# Altium PCB PCB1.PcbDoc (part 2 of 3)
Units mm, origin at the board's own origin, x right, y up, seen from the top; angles counter-clockwise.
Board outline 115 x 52 mm, 2 copper layers (Top Layer, Bottom Layer); 184 components, 116 nets, 555 pads, 115 vias.
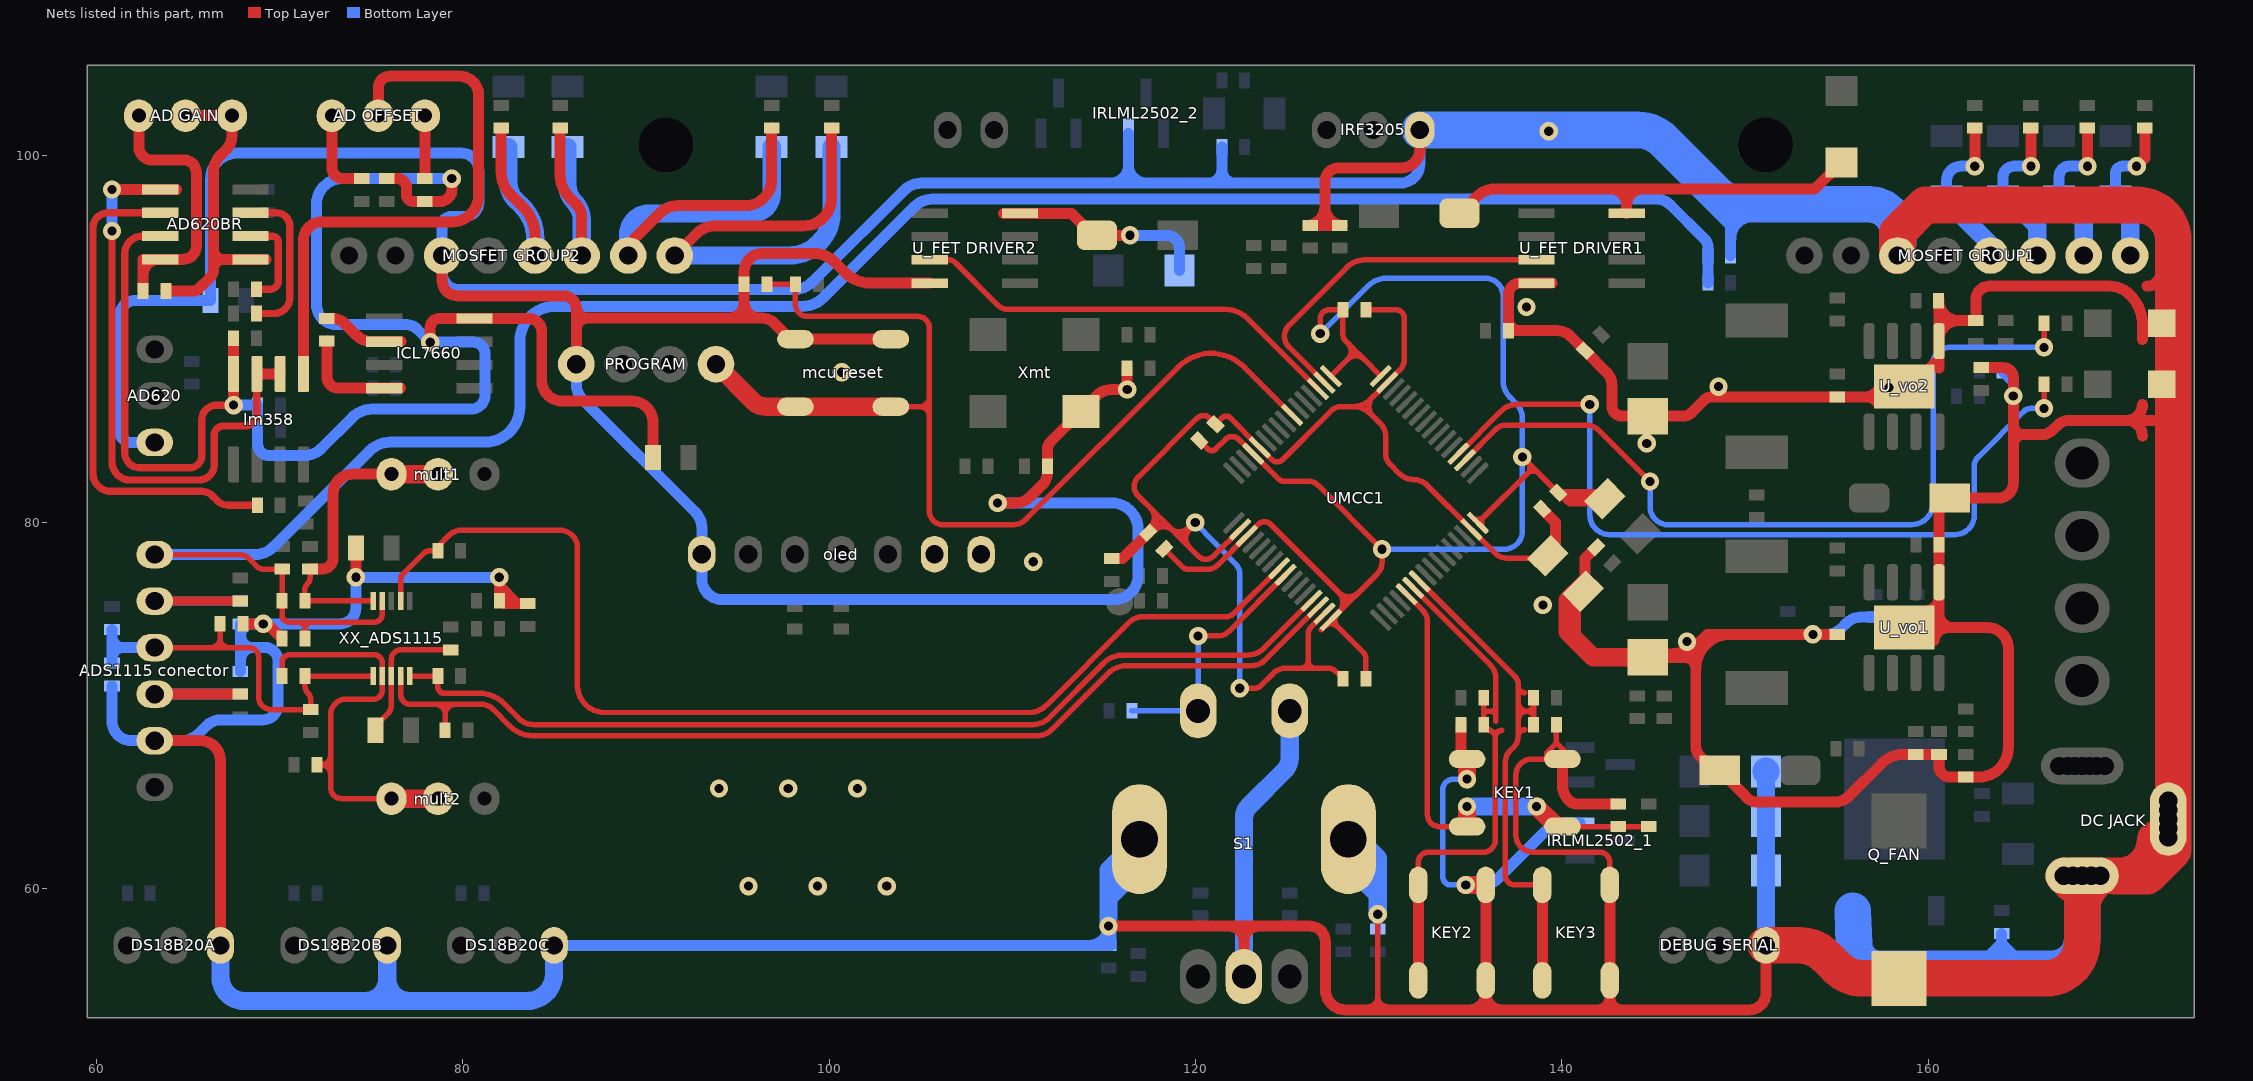
[diagram p2: the nets of this part, all layers, seen from the top]

## Via types
v1: diameter 1, hole 0.5, Top Layer to Bottom Layer, 115 vias

## Nets (pads, with @x,y where several pads share a name; then routed paths per layer and width w, separated by ;. In a path a pad name is that pad's centre, name@x,y a point inside that pad or via, vN(x,y) a via of type N, cw(c..) or ccw(c..) an arc to the next point about the centre after c; other vN are vias at no path point) (continued)
ADIN0: "ADS1115 conector.6" C_Lp1.1 C_LpM1.2 RTW1.2 VOLTAGE_DEVIDE1.2 VOLTAGE_DEVIDE2.2 XX_ADS1115.4 | length 116.4
  Top Layer w0.3: 63.179,78.244 67.766,78.244 cw(c67.766,77.423) 68.346,78.004 68.737,77.613 ccw(c69.153,78.029) 69.153,77.441 RTW1.2@70.136,77.441 C_Lp1.1@70.136,75.711 70.136,74.944 ccw(c70.53,74.944) 70.53,74.55 71.03,74.55 ; C_LpM1.2@71.38,73.66 71.38,74.2 ; XX_ADS1115.4@75.604,75.711 75.604,74.984 cw(c75.17,74.984) 75.17,74.55 71.73,74.55 ; 71.03,74.55 cw(c71.03,74.2) 71.38,74.2 ; 71.03,74.55 71.73,74.55 ; 71.38,74.2 cw(c71.73,74.2) 71.73,74.55
  Bottom Layer w0.6: 63.179,78.244 68.656,78.244 ccw(c68.656,79.664) 69.659,78.659 74.875,83.875 cw(c76.094,82.656) 76.094,84.38 81.205,84.38 ccw(c81.205,86.285) 83.11,86.285 83.11,89.868 cw(c85.032,89.868) 85.032,91.79 98.517,91.79 ccw(c98.517,93.462) 99.7,92.28 104.658,97.238 cw(c105.63,96.264) 105.63,97.64 145.18,97.64 cw(c145.18,96.602) 145.914,97.336 147.79,95.46 cw(c147.354,95.025) 147.97,95.025 VOLTAGE_DEVIDE2.2@147.97,94.564 VOLTAGE_DEVIDE1.2@147.97,93.07
ADIN1: C_Lp1.2 mult1.2 mult1.3 RTW2.1 XX_ADS1115.5 | length 17
  Top Layer w0.3: RTW2.1@71.66,77.441 71.66,76.978 cw(c71.182,76.978) 71.52,76.64 ccw(c71.859,76.302) 71.38,76.302 C_Lp1.2@71.38,75.711 XX_ADS1115.5@75.104,75.711
  Top Layer w0.6: RTW2.1@71.66,77.441 72.29,77.441 ccw(c72.29,78.071) 72.92,78.071 72.92,81.567 cw(c73.983,81.567) 73.983,82.63 mult1.3@76.104,82.63
  Top Layer w1: mult1.3@76.104,82.63 mult1.2@78.644,82.63
ADIN2: "ADS1115 conector.4" C_Lp2.1 C_LpM2.2 RTW4.2 VOLTAGE_DEVIDE3.2 VOLTAGE_DEVIDE4.2 XX_ADS1115.6 | length 24.8
  Top Layer w0.3: 63.179,73.164 66.27,73.164 ; C_LpM2.2@66.748,74.46 66.748,73.642 ; 71.545,70.685 cw(c71.943,71.083) 71.38,71.083 C_Lp2.1@71.38,71.611 XX_ADS1115.6@75.104,71.611 ; 71.545,70.685 cw(c71.147,70.287) 71.71,70.287 RTW4.2@71.71,69.781 69.549,69.781 cw(c69.549,70.48) 68.85,70.48 68.85,72.67 ccw(c68.356,72.67) 68.356,73.164 67.226,73.164 ; 66.27,73.164 ccw(c66.27,73.642) 66.748,73.642 ; 66.27,73.164 67.226,73.164 ; 66.748,73.642 ccw(c67.226,73.642) 67.226,73.164
  Bottom Layer w0.6: VOLTAGE_DEVIDE4.2@60.85,72.31 VOLTAGE_DEVIDE4.2@60.85,72.569 ; VOLTAGE_DEVIDE3.2@60.85,74.156 60.85,73.76 ; 63.179,73.164 61.446,73.164 ; VOLTAGE_DEVIDE4.2@60.85,72.569 cw(c61.446,72.569) 61.446,73.164 ; VOLTAGE_DEVIDE4.2@60.85,72.569 60.85,73.76 ; 60.85,73.76 ccw(c61.446,73.76) 61.446,73.164
ADIN3: C_Lp2.2 mult2.2 mult2.3 RTW5.1 XX_ADS1115.7 | length 23.6
  Top Layer w0.3: C_Lp2.2@70.136,71.611 70.136,72.377 cw(c70.53,72.377) 70.53,72.772 75.17,72.772 cw(c75.17,72.337) 75.604,72.337 XX_ADS1115.7@75.604,71.611 75.604,70.834 cw(c75.12,70.834) 75.12,70.35 73.637,70.35 ccw(c73.637,69.493) 72.78,69.493 72.78,67.27 ; mult2.3@76.104,64.92 73.38,64.92 cw(c73.38,65.52) 72.78,65.52 72.78,66.25 ; 72.78,66.25 ccw(c72.27,66.25) 72.27,66.76 ccw(c72.27,67.27) 72.78,67.27 ; 72.78,66.25 72.78,67.27
  Top Layer w1: mult2.3@76.104,64.92 mult2.2@78.644,64.92
ADS_1115_SCK: R_SCL.2 UMCC1.29 XX_ADS1115.10 | length 53.2
  Top Layer w0.3: XX_ADS1115.10@77.104,71.611 R_SCL.2@78.639,71.611 78.639,71.001 ccw(c78.97,71.001) 78.97,70.67 80.904,70.67 cw(c80.904,68.772) 82.246,70.114 83.074,69.286 ccw(c83.86,70.072) 83.86,68.96 111.123,68.96 ccw(c111.123,70.185) 111.989,69.319 115.017,72.347 cw(c115.99,71.373) 115.99,72.75 122.816,72.75 ccw(c122.816,74.053) 123.737,73.132 UMCC1.29@126.331,75.725
ADS_1115_SDA: R_SDA.2 UMCC1.30 XX_ADS1115.9 | length 57.4
  Top Layer w0.3: XX_ADS1115.9@76.604,71.611 76.604,70.604 ccw(c77.139,70.604) 77.139,70.07 78.48,70.07 ; R_SDA.2@79.039,68.65 79.039,69.511 ; UMCC1.30@126.684,75.371 123.802,72.489 cw(c123.056,73.234) 123.056,72.18 116.259,72.18 ccw(c116.259,70.703) 115.213,71.746 114.019,70.551 112.136,68.669 cw(c111.39,69.415) 111.39,68.36 83.798,68.36 cw(c83.798,70.069) 82.589,68.861 81.64,69.81 ccw(c81.012,69.182) 81.012,70.07 79.597,70.07 ; 78.48,70.07 cw(c78.48,69.511) 79.039,69.511 ; 78.48,70.07 79.597,70.07 ; 79.039,69.511 cw(c79.597,69.511) 79.597,70.07
alert: R_Alert.1 UMCC1.24 XX_ADS1115.2 | length 62.4
  Top Layer w0.3: XX_ADS1115.2@76.604,75.711 76.604,76.884 cw(c76.992,76.884) 76.718,77.158 77.862,78.302 cw(c78.204,77.961) 78.204,78.444 R_Alert.1@78.639,78.444 78.639,78.679 79.261,79.301 ; 79.262,79.302 cw(c79.91,78.653) 79.91,79.57 85.307,79.57 cw(c85.307,78.617) 86.26,78.617 86.26,71.108 ccw(c87.748,71.108) 87.748,69.62 110.905,69.62 ccw(c110.905,70.96) 111.852,70.012 116.38,74.54 cw(c117.129,73.79) 117.129,74.85 121.649,74.85 ccw(c121.649,75.506) 122.112,75.042 UMCC1.24@124.563,77.493
AVCC_ANALOG: AD620BR.7 C_ICL4.1 C_LO1.1 C_LO2.1 C_LO3.1 CLOP1.1 ICL7660.8 lm358.8 RP1.2 | length 94.9
  Top Layer w0.4: AD620BR.7@63.19,95.625 62.495,95.625 ccw(c62.495,94.68) 61.55,94.68 61.55,83.79 ccw(c62.36,83.79) 62.36,82.98 65.09,82.98 ccw(c65.09,83.64) 65.75,83.64 65.75,85.58 cw(c66.569,85.58) 66.569,86.399 v1(67.49,86.399)
  Top Layer w0.6: v1(67.49,86.399) lm358.8@67.49,88.1 C_LO3.1@67.49,90.04 ; C_ICL4.1@75.86,98.763 76.427,98.763 cw(c76.427,98.27) 76.92,98.27 76.92,97.895 ccw(c77.296,97.895) 77.296,97.519 RP1.2@77.93,97.519 78.759,97.519 ccw(c78.759,98.162) 79.402,98.162 79.402,98.763 v1(79.4,98.763) ; v1(78.22,89.835) 78.22,90.61 cw(c78.745,90.61) 78.745,91.135 ICL7660.8@80.644,91.135 83.575,91.135 cw(c83.575,90.4) 84.31,90.4 84.31,87.74 ccw(c85.43,87.74) 85.43,86.62 89.21,86.62 cw(c89.21,85.44) 90.39,85.44 CLOP1.1@90.39,83.54
  Bottom Layer w0.6: v1(67.49,86.399) C_LO2.1@68.806,86.399 C_LO1.1@68.806,85.039 68.806,84.274 ccw(c69.43,84.274) 69.43,83.65 71.371,83.65 ccw(c71.371,84.902) 72.257,84.017 73.975,85.735 cw(c75.05,84.659) 75.05,86.18 80.45,86.18 ccw(c80.45,86.94) 81.21,86.94 81.21,89.21 ccw(c80.585,89.21) 80.585,89.835 v1(78.22,89.835) 77.488,90.567 ; 77.487,90.568 ccw(c76.95,90.03) 76.95,90.79 73.117,90.79 cw(c73.117,91.897) 72.01,91.897 72.01,97.358 cw(c73.415,97.358) 73.415,98.763 v1(79.4,98.763)
CS: oled.7
DS: oled.6
GATE1: "MOSFET GROUP1.1" D_GATE1.1 R_gate1.1 | length 8.5
  Top Layer w0.6: v1(171.37,99.44) 171.819,99.889 R_gate1.1@171.819,101.518
  Bottom Layer w0.6: D_GATE1.1@170.219,97.79 170.219,99.049 cw(c170.61,99.049) 170.61,99.44 v1(171.37,99.44)
  Bottom Layer w1: D_GATE1.1@170.219,97.79 171.019,96.99 171.019,95.871 171.019,94.564
GATE2: "MOSFET GROUP1.2" D_GATE2.1 R_gate2.1 | length 8.8
  Top Layer w0.6: v1(168.685,99.44) R_gate2.1@168.685,101.518
  Bottom Layer w0.6: D_GATE2.1@167.145,97.79 167.145,98.895 cw(c167.69,98.895) 167.69,99.44 v1(168.685,99.44)
  Bottom Layer w1: D_GATE2.1@167.145,97.79 168.479,96.457 168.479,94.564
GATE3: "MOSFET GROUP1.3" D_GATE3.1 R_gate3.1 | length 9.2
  Top Layer w0.6: v1(165.602,99.44) R_gate3.1@165.602,101.518
  Bottom Layer w0.6: D_GATE3.1@164.072,97.79 164.072,98.842 cw(c164.67,98.842) 164.67,99.44 v1(165.602,99.44)
  Bottom Layer w1: D_GATE3.1@164.072,97.79 164.34,97.79 165.939,96.191 165.939,94.564
GATE4: "MOSFET GROUP1.4" D_GATE4.1 R_gate4.1 | length 8.9
  Top Layer w0.6: v1(162.539,99.44) R_gate4.1@162.539,101.518
  Bottom Layer w0.6: D_GATE4.1@160.999,97.79 160.999,98.658 cw(c161.781,98.658) 161.781,99.44 v1(162.539,99.44)
  Bottom Layer w1: D_GATE4.1@160.999,97.571 163.399,95.171 163.399,94.564
GATE5: "MOSFET GROUP2.1" D_GATE5.1 R_gate5.1 | length 27.3
  Top Layer w0.6: 91.569,94.564 92.786,95.781 cw(c93.75,94.817) 93.75,96.18 98.602,96.18 ccw(c98.602,97.708) 100.13,97.708 R_gate5.1@100.13,101.518
  Bottom Layer w1: 91.569,94.564 97.774,94.564 ccw(c97.774,96.92) 100.13,96.92 D_GATE5.1@100.13,100.49
GATE6: "MOSFET GROUP2.2" D_GATE6.1 R_gate6.1 | length 25.5
  Top Layer w0.6: 88.75,94.87 90.774,96.894 cw(c91.73,95.938) 91.73,97.29 95.43,97.29 ccw(c95.43,98.72) 96.86,98.72 R_gate6.1@96.86,101.518
  Bottom Layer w1: 89.029,94.564 89.021,95.668 cw(c90.196,95.685) 90.196,96.86 95.79,96.86 ccw(c95.79,97.93) 96.86,97.93 D_GATE6.1@96.86,100.49
GATE7: "MOSFET GROUP2.3" D_GATE7.1 R_gate7.1 | length 13.5
  Top Layer w0.6: R_gate7.1@85.31,101.518 85.31,98.99 ccw(c87.072,98.99) 85.826,97.744 ; 85.826,97.744 86.158,97.412 ; 86.158,97.412 cw(c85.357,96.612) 86.489,96.612 86.489,94.564
  Bottom Layer w1: D_GATE7.1@85.71,100.49 85.71,98.421 ccw(c87.04,98.421) 86.099,97.481 ; 86.1,97.48 cw(c85.159,96.54) 86.489,96.54 86.489,94.564
GATE8: "MOSFET GROUP2.4" D_GATE8.1 R_gate8.1 | length 13.9
  Top Layer w0.6: R_gate8.1@82.09,101.518 82.09,99.16 ccw(c83.901,99.16) 82.62,97.88 83.285,97.215 cw(c81.681,95.611) 83.949,95.611 83.949,94.564
  Bottom Layer w1: D_GATE8.1@82.49,100.49 82.49,98.523 ccw(c83.752,98.523) 82.86,97.63 83.229,97.261 cw(c81.492,95.523) 83.949,95.523 83.949,94.564
GATE_CH1_EN: "U_FET DRIVER1.3" UMCC1.2 | length 19
  Top Layer w0.3: UMCC1.2@127.038,87.633 125.102,89.568 cw(c125.687,90.16) 125.098,90.748 128.292,93.942 cw(c129.229,93.005) 129.229,94.33 137.392,94.33 138.606,94.33
GATE_CH2_EN: "U_FET DRIVER2.3" UMCC1.3 | length 24
  Top Layer w0.3: 105.486,94.33 106.505,94.33 cw(c106.505,93.786) 106.889,94.171 109.189,91.871 ccw(c109.774,92.459) 109.774,91.63 121.607,91.63 cw(c121.607,89.875) 122.847,91.116 UMCC1.3@126.684,87.279
GND: "ADS1115 conector.2" "DC JACK.2" "DC JACK.3" "DEBUG SERIAL.1" "Elko E_1.1" "Ferrit  2.2" "mcu reset.2" "mcu reset.4" "MOSFET GROUP1.6" "MOSFET GROUP2.6" "tantal classB1.1" "tantal classB9.1" "U_FET DRIVER1.4" "U_FET DRIVER2.4" AD620.1 C_KEY1.2 C_KEY2.2 C_KEY3.2 C_LK2.1 C_LL1.2 C_LL2.2 C_LpM1.1 C_LpM2.1 C_PREG2.1 C_PREG3.1 C_PREG4.1 C_reg2.2 C_regl.2 C_reh1.2 C_rehc.2 CIP1.2 CIP2.2 CLM1.2 CLOP2.2 CLxt.2 CT1.2 CT2.1 CXT.2 CXT_Reset1.2 DPND1.1 DPNDd.1 DS18B20A.1 DS18B20B.1 DS18B20C.1 IRF3205.3 IRLML2502_1.2 IRLML2502_2.2 JUMPER1.1 JUMPER2.1 KEY1.2 KEY1.4 KEY2.2 KEY2.4 KEY3.2 KEY3.4 LED_1P.2 LED_2P.2 oled.1 PROGRAM.4 Q_FAN.3 R_ADDR1.1 R_BOOT.2 R_feedaback2.2 R_feedabacko.2 R_gateF.2 R_gateHP.2 Rreg1.2 Rregp5.2 Rrer1.2 Rrer7.2 Rrerp2.1 Rrerp6.1 S1.2 S1.C S1.SH1 S1.SH2 U_vo1.5 U_vo1.9 U_vo2.5 U_vo2.9 VOLTAGE_DEVIDE2.1 VOLTAGE_DEVIDE4.1 Xmt.2 | length 831.8
  Top Layer w0.254: R_ADDR1.1@81.994,75.711 ccw(c82.113,75.711) R_ADDR1.1@82.113,75.592
  Top Layer w0.3: 129.378,53.538 ccw(c129.378,54.11) 129.95,54.11 ; v1(129.95,58.611) 129.95,54.11 ; 130.522,53.538 cw(c130.522,54.11) 129.95,54.11 ; KEY1.2@139.18,67.14 139.18,67.43 139.7,67.95 ; C_KEY3.2@139.7,68.96 139.7,67.95 ; KEY1.2@140.029,67.077 138.357,67.077 ccw(c138.357,66.21) 137.49,66.21 137.49,62.92 ccw(c138.41,62.92) 138.41,62 142.049,62 cw(c142.049,61.436) 142.612,61.436 KEY3.4@142.612,60.207 ; KEY1.2@140.573,67.077 139.7,67.95
  Top Layer w0.6: 63.179,68.084 65.686,68.084 cw(c65.686,66.999) 66.771,66.999 DS18B20A.1@66.771,56.906 ; C_LpM2.1@67.992,74.46 v1(69.11,74.46) 69.336,74.46 C_LpM1.1@70.136,73.66 ; v1(74.164,77) CLM1.2@74.164,78.59 ; 78.869,94.564 78.869,93.221 ccw(c79.73,93.221) 79.73,92.36 85.5,92.36 cw(c85.5,91.66) 86.2,91.66 86.2,90.552 ; R_ADDR1.1@81.99,75.711 v1(81.99,77) ; R_ADDR1.1@81.994,75.711 ccw(c82.334,76.051) 82.334,75.57 C_LK2.1@83.55,75.57 ; 82.083,76.44 82.942,75.58 ; PROGRAM.4@86.2,88.635 86.2,90.552 ; 86.2,91.748 ccw(c86.8,91.75) 86.799,91.15 ; 103.367,90 98.16,90 98.118,90 cw(c98.118,90.6) 97.694,90.176 96.98,90.89 ccw(c96.352,90.262) 96.352,91.15 96.2,91.15 ; 105.486,93.06 102.26,93.06 cw(c102.26,95.015) 100.877,93.633 100.305,94.205 ccw(c99.158,93.058) 99.158,94.68 96.36,94.68 ccw(c96.36,93.682) 95.362,93.682 CXT_Reset1.2@95.362,93 95.362,91.992 ; v1(109.194,81.06) 110.171,81.06 ccw(c110.171,82.192) 110.971,81.391 111.652,82.072 ccw(c111.029,82.695) 111.91,82.695 CXT.2@111.91,83.06 111.91,83.964 cw(c112.525,83.964) 112.09,84.399 Xmt.2@113.75,86.059 ; Xmt.2@113.949,86.258 114.619,86.928 cw(c115.396,86.151) 115.396,87.25 v1(116.27,87.25) CLxt.2@116.27,88.414 ; v1(115.25,57.96) 121.83,57.96 ; S1.C@122.64,55.21 122.64,57.15 ; CIP1.2@126.125,96.214 ccw(c126.03,97.24) 127.06,97.24 ; CIP1.2@126.25,96.214 126.925,96.214 ; 126.83,96.21 ccw(c126.83,97.24) 126.925,96.214 ; CIP2.2@127.86,96.214 127.06,96.214 ; CIP2.2@127.995,96.214 cw(c128.09,97.24) 127.06,97.24 ; IRF3205.3@132.24,101.418 132.24,100.34 cw(c131.25,100.34) 131.25,99.35 127.82,99.35 ccw(c127.82,98.59) 127.06,98.59 127.06,97.24 ; C_KEY2.2@134.488,68.96 134.488,67.412 ccw(c134.822,67.412) KEY1.4@134.822,67.077 ; KEY2.4@135.844,60.207 KEY2.2@135.844,55 KEY2.2@135.844,54.274 ; 137.074,91.106 ccw(c137.72,91.106) 137.074,91.104 ; 137.72,90.46 cw(c137.72,91.106) 137.718,90.46 ; 139.47,93.06 138.606,93.06 137.72,93.06 ccw(c137.72,92.414) 137.074,92.414 137.074,91.104 ; KEY1.2@140.029,67.077 140.029,65.645 ccw(c141.169,65.645) 140.49,64.73 ccw(c140.767,65.104) 140.767,64.638 C_KEY1.2@143.08,64.638 ; 141.27,76.7 141.27,78.04 C_LL2.2@141.87,78.64 ; KEY3.4@142.612,60.207 KEY3.2@142.612,55 KEY3.2@142.612,54.032 ; 144.68,72.635 146.695,72.635 ; 145.829,72.821 ccw(c145.829,75.361) 147.625,73.565 ; 147.31,72.02 cw(c149.17,72.02) 149.17,73.88 ; DPND1.1@148.31,66.46 147.537,67.233 cw(c148.096,67.793) 147.305,67.793 147.305,72.025 ; DPND1.1@148.61,66.46 149.179,65.96 ccw(c149.562,66.073) 149.278,65.792 149.989,65.081 ccw(c150.667,65.56) 150.667,64.73 154.885,64.73 ccw(c154.885,65.853) 155.679,65.059 157.47,66.85 ; 151.14,56.906 151.14,54.31 cw(c150.22,54.31) 150.22,53.39 143.255,53.39 ; Rrerp2.1@155.03,73.886 v1(153.7,73.886) 147.946,73.886 147.305,73.244 ; U_vo2.9@157.071,86.681 ccw(c156.647,86.256) 156.647,86.856 ; U_vo2.9@157.071,86.691 U_vo2.9@157.241,86.521 ; U_vo2.9@157.241,87.201 157.071,87.031 cw(c156.647,87.456) 156.647,86.856 ; 157.471,66.851 cw(c158.634,65.687) 158.634,67.332 C_reg2.2@159.315,67.332 R_feedaback2.2@160.585,67.332 160.585,66.688 ccw(c161.185,66.688) 161.185,66.088 C_reh1.2@162.04,66.088 162.728,66.088 ccw(c162.728,67.73) 164.37,67.73 164.37,73.11 ccw(c163.225,73.11) 163.225,74.255 160.703,74.255 ; U_vo2.9@158.68,87.42 158.831,87.42 ccw(c158.831,88.02) 159.255,87.595 160.41,88.75 ; U_vo1.9@159.918,75.17 ccw(c159.831,75.92) U_vo1.5@160.585,75.875 ; U_vo1.9@160.035,73.505 cw(c160.79,73.505) 160.703,74.255 ; U_vo1.9@160.035,75.005 ccw(c160.79,75.005) 160.369,74.379 ; U_vo1.9@160.305,73.557 cw(c161.057,73.49) 160.97,74.24 ; U_vo1.9@160.32,74.33 160.369,74.379 ; Rrer7.2@160.569,92.1 ccw(c161.654,92.1) Rrer7.2@160.585,91.917 ; Rrer1.2@160.575,78.77 160.575,80.73 cw(c161.175,80.73) DPNDd.1@161.175,81.33 163.83,81.33 ccw(c163.83,82.14) 164.64,82.14 164.64,84.287 ; 160.582,75.01 ccw(c161.337,75.01) 160.585,74.943 ; Rrer1.2@160.585,78.77 U_vo1.5@160.585,76.73 U_vo1.5@160.585,75.875 ; 160.585,88.432 U_vo2.5@160.585,89.895 U_vo2.5@160.585,90.113 ; Rrer7.2@160.585,92.174 Rrer7.2@160.585,91.917 ; U_vo1.5@160.586,75.92 cw(c159.831,75.92) U_vo1.5@160.585,75.875 ; 161.25,74.26 cw(c161.337,75.01) 160.585,74.943 ; C_regl.2@162.899,88.442 164.088,88.442 cw(c164.088,87.89) 164.64,87.89 v1(164.64,86.9) 164.64,85.293 ; 164.638,84.238 cw(c165.19,84.238) 164.64,84.287 ; 164.638,85.342 ccw(c165.19,85.342) 164.64,85.293 ; 164.66,84.79 165.19,84.79 ; 171.006,92.424 ccw(c169.881,91.3) 169.881,92.89 163.33,92.89 ccw(c163.33,92.159) 162.599,92.159 R_feedabacko.2@162.599,91.015 161.654,91.015 ; 171.007,92.423 cw(c169.33,90.748) 171.7,90.748 171.7,89.99 ; 171.687,84.716 ccw(c170.832,84.716) 170.879,85.57 ; 171.687,86.426 cw(c170.832,86.426) 170.832,85.571 cw(c170.832,84.716) 170.869,85.57 ; 171.695,86.425 cw(c170.84,86.425) 170.869,85.57 ; 171.95,92.9 ccw(c171.95,93.631) 172.681,93.631 ; 173.38,85.54 173.35,85.57 173.1,85.57 170.879,85.57 ; 86.2,90.552 cw(c86.8,90.55) 86.799,91.15 ; 86.799,91.15 ccw(c86.8,91.75) 86.8,91.15 ; 86.799,91.15 cw(c86.8,90.55) 86.8,91.15 ; 86.8,91.15 94.52,91.15 ; 94.52,91.15 ccw(c94.52,91.992) 95.362,91.992 ; 94.52,91.15 96.2,91.15 ; 95.362,91.992 ccw(c96.204,91.992) 96.2,91.15 ; 121.83,57.96 cw(c121.83,57.15) 122.64,57.15 ; 121.83,57.96 123.45,57.96 ; 122.64,57.15 cw(c123.45,57.15) 123.45,57.96 ; 123.45,57.96 126.23,57.96 cw(c126.23,57.1) 127.09,57.1 127.09,54.48 ccw(c128.18,54.48) 128.18,53.39 134.96,53.39 ; 126.925,96.214 127.06,96.214 ; 127.06,96.214 127.06,97.24 ; 134.96,53.39 ccw(c134.96,54.274) KEY2.2@135.844,54.274 ; 134.96,53.39 136.727,53.39 ; KEY2.2@135.844,54.274 ccw(c136.727,54.274) 136.727,53.39 ; 136.727,53.39 141.97,53.39 ; 137.074,91.104 ccw(c137.72,91.106) 137.718,90.46 ; 137.074,91.104 R_BOOT.2@137.074,90.46 137.718,90.46 ; 137.718,90.46 139.732,90.46 cw(c139.732,89.402) 140.48,90.15 C_rehc.2@141.26,89.37 142.442,88.188 cw(c141.771,87.517) 142.72,87.517 142.72,86.37 ccw(c143.29,86.37) 143.29,85.8 144.68,85.8 146.637,85.8 ccw(c146.637,86.4) 147.061,85.975 147.767,86.681 cw(c148.19,86.256) 148.188,86.856 148.19,86.856 Rrerp6.1@155.03,86.856 156.647,86.856 ; 141.97,53.39 ccw(c141.97,54.032) KEY3.2@142.612,54.032 ; 141.97,53.39 143.255,53.39 ; KEY3.2@142.612,54.032 ccw(c143.255,54.032) 143.255,53.39 ; 146.695,72.635 cw(c146.695,72.025) 147.305,72.025 ; 146.695,72.635 147.305,73.244 ; 147.305,72.025 147.305,73.244 ; 160.369,74.379 ccw(c160.79,75.005) 160.703,74.255 ; 160.369,74.379 160.585,74.595 160.585,74.943 ; 160.585,74.943 U_vo1.5@160.585,75.875 ; U_vo2.5@160.585,90.113 cw(c161.654,89.93) 161.654,91.015 ; U_vo2.5@160.585,90.113 Rrer7.2@160.585,91.917 ; Rrer7.2@160.585,91.917 ccw(c161.654,92.1) 161.654,91.015 ; 164.64,84.287 cw(c165.19,84.238) 165.19,84.79 ; 164.64,84.287 164.64,85.293 ; 164.64,85.293 ccw(c165.19,85.342) 165.19,84.79 ; 165.19,84.79 166.198,84.79 ccw(c166.198,85.615) 166.782,85.032 167.023,85.273 cw(c167.74,84.556) 167.74,85.57 170.84,85.57 ; 170.84,85.57 ccw(c170.84,86.425) 170.869,85.57 ; 170.84,85.57 170.879,85.57 ; 170.869,85.57 cw(c170.832,84.716) 170.879,85.57
  Top Layer w1: v1(134.75,60.207) KEY2.4@135.844,60.207 ; v1(134.822,65.983) KEY1.4@134.822,67.077 ; 140.548,73.803 140.548,75.533 ; 141.27,76.7 140.32,75.75 140.32,74.02 141.705,72.635 144.68,72.635 ; 173.1,63.8 173.1,64.3 173.1,64.8 ; 173.1,85.57 LED_1P.2@173.1,87.55
  Top Layer w2: 151.14,56.906 152.966,56.906 cw(c152.966,54.906) 154.382,56.318 155.01,55.69 ccw(c156.423,57.105) 156.423,55.105 158.41,55.105 166.4,55.105 ccw(c166.4,57.105) 168.4,57.105 168.4,58.872 cw(c170.4,58.872) 168.986,60.286 ; 158.319,94.564 158.319,95.809 159.83,97.32 171.43,97.32 cw(c171.43,95.37) 173.38,95.37 173.38,85.54 ; 167.4,60.7 167.814,60.286 ; 167.9,60.7 168.4,60.7 169.4,60.7 170.58,60.7 ; 170.188,60.675 171.955,60.675 173.38,62.1 173.38,64.8 173.38,85.54 ; 170.38,60.69 ccw(c170.38,62.69) 170.58,60.7 ; 172.38,62.69 cw(c170.38,62.69) 170.58,60.7 ; 173.1,62.8 173.1,62.7 cw(c171.1,62.7) 171.1,60.7 170.58,60.7 ; 173.1,63.24 173.1,63.3 173.1,63.8 ; 173.38,81.845 173.38,85.54
  Bottom Layer w0.3: CT2.1@129.95,57.804 v1(129.95,58.611) ; v1(134.75,60.207) 133.943,60.207 cw(c133.943,60.66) 133.49,60.66 133.49,65.39 cw(c134.083,65.39) 134.083,65.983 v1(134.822,65.983)
  Bottom Layer w0.6: VOLTAGE_DEVIDE4.1@60.85,71.066 60.85,69.147 ccw(c61.912,69.147) 61.912,68.084 63.179,68.084 64.624,68.084 ccw(c64.624,69.485) 65.614,68.494 ; AD620.1@63.179,84.36 61.92,84.36 cw(c61.92,85.03) 61.25,85.03 61.25,91.21 cw(c62.16,91.21) 62.16,92.12 CLOP2.2@66.23,92.12 66.23,98.72 cw(c67.66,98.72) 67.66,100.15 79.92,100.15 cw(c79.92,99.19) 80.88,99.19 80.88,97.5 cw(c80.07,97.5) 80.07,96.69 79.36,96.69 ccw(c79.36,96.199) 78.869,96.199 78.869,94.564 78.869,93.626 ccw(c79.785,93.626) 79.785,92.71 98.08,92.71 ccw(c98.08,94.134) 99.087,93.127 99.46,93.5 104.077,98.117 cw(c105.05,97.143) 105.05,98.52 115.37,98.52 ; 65.615,68.495 66.025,68.905 cw(c66.785,68.145) 66.785,69.22 69.09,69.22 ccw(c69.09,70.05) 69.92,70.05 69.92,72.43 ccw(c69.186,72.43) 69.186,73.164 68.523,73.164 ; JUMPER2.1@67.86,71.869 67.86,73.164 ; 67.872,73.812 cw(c68.52,73.812) 68.509,74.46 ; 67.875,72.517 cw(c68.523,72.517) 68.523,73.164 ; 67.875,73.812 ccw(c68.523,73.812) 68.523,73.164 ; 68.52,74.46 ccw(c68.52,73.812) 68.509,74.46 ; v1(81.99,77) v1(74.164,77) 74.164,75.324 cw(c73.3,75.324) 73.3,74.46 v1(69.11,74.46) 68.509,74.46 ; DS18B20C.1@84.981,56.906 114.196,56.906 ; PROGRAM.4@86.2,88.635 86.2,87.5 ccw(c87.287,87.5) 86.518,86.732 92.698,80.552 cw(c91.848,79.702) 93.05,79.702 oled.1@93.05,78.26 93.05,76.9 ccw(c94.17,76.9) 94.17,75.78 115.53,75.78 ccw(c115.53,77.12) 116.87,77.12 116.87,79.59 ccw(c115.4,79.59) 115.4,81.06 v1(109.194,81.06) ; CT1.2@115.38,56.906 v1@115.38,57.96 ; IRLML2502_2.2@116.34,101.24 116.34,99.49 ; R_gateHP.2@121.438,100.49 121.438,99.238 ; IRF3205.3@132.24,101.418 132.24,99.578 cw(c131.182,99.578) 131.182,98.52 122.156,98.52 ; v1(134.75,60.207) 135.643,60.207 ccw(c135.643,61.471) 136.537,60.577 139.105,63.145 ; 139.106,63.146 cw(c140.155,62.095) 140.155,63.58 IRLML2502_1.2@140.99,63.58 ; 148.061,97.339 149.205,96.195 ; VOLTAGE_DEVIDE2.1@149.214,94.564 149.214,97.467 149.214,97.626 ; 149.22,95.5 cw(c150.396,95.5) 150.396,96.676 ; C_LL1.2@152.33,73.886 v1(153.7,73.886) 154.485,73.886 ccw(c154.485,74.926) 155.22,74.19 ; 155.22,74.19 155.525,74.495 cw(c156.329,73.691) 156.329,74.828 Rreg1.2@157.07,74.828 ; 162.99,55.63 162.99,56 164,57.01 ; R_gateF.2@164,57.556 164,57.01 ; Rregp5.2@164.027,88.28 164.64,87.667 v1(164.64,86.9) ; 165.01,56 164,57.01 ; 67.86,73.164 68.523,73.164 ; 67.86,73.164 JUMPER1.1@67.86,74.46 68.509,74.46 ; 114.196,56.906 ccw(c114.196,57.96) v1(115.25,57.96) CT1.2@115.25,56.906 114.196,56.906 ; 115.37,98.52 ccw(c115.37,99.49) 116.34,99.49 ; 115.37,98.52 117.31,98.52 ; 116.34,99.49 ccw(c117.31,99.49) 117.31,98.52 ; 117.31,98.52 120.72,98.52 ; 120.72,98.52 ccw(c120.72,99.238) 121.438,99.238 ; 120.72,98.52 122.156,98.52 ; 121.438,99.238 ccw(c122.156,99.238) 122.156,98.52
  Bottom Layer w1: DS18B20A.1@66.771,56.906 66.771,55.179 ccw(c68.08,55.179) 68.08,53.87 74.68,53.87 ; DS18B20B.1@75.876,56.906 75.876,55.066 ; DS18B20C.1@84.981,56.906 84.981,55.351 cw(c83.5,55.351) 83.5,53.87 77.072,53.87 ; v1(115.25,57.96) 115.25,59.49 ; S1.SH1@116.94,61.18 115.25,59.49 ; S1.SH1@116.94,62.71 115.25,61.02 115.25,59.49 ; S1.C@122.64,55.21 122.64,63.828 cw(c123.64,63.826) 122.931,64.531 124.849,66.449 ccw(c124.14,67.154) 125.14,67.154 S1.2@125.14,69.71 ; S1.SH2@128.14,61.49 129.83,59.8 ; S1.SH2@128.26,63.361 129.95,61.671 v1(129.95,58.611) ; 151.14,56.906 C_PREG3.1@151.14,66.4 ; 167.9,60.7 168.4,60.7 ; 74.68,53.87 ccw(c74.68,55.066) 75.876,55.066 ; 74.68,53.87 77.072,53.87 ; 75.876,55.066 ccw(c77.072,55.066) 77.072,53.87
  Bottom Layer w2: IRF3205.3@132.24,101.418 144.144,101.418 cw(c144.144,99.418) 145.555,100.835 148.446,97.944 ccw(c149.858,99.36) 149.214,97.467 ccw(c149.858,99.36) 149.855,97.36 156.759,97.36 cw(c156.759,95.765) 158.352,95.669 158.319,94.564 ; Q_FAN.3@155.88,58.8 155.943,56.981 ccw(c157.342,57.029) 157.32,55.63 162.99,55.63 166.75,55.63 ccw(c166.75,57.28) 168.4,57.28 168.4,60.7
  other v1: 95.594,60.14 99.37,60.14 103.145,60.14 93.989,65.468 97.764,65.468 101.54,65.468 146.828,73.488 138.961,75.492 111.136,77.853 144.628,84.312 157.848,87.361 148.547,87.41 100.678,88.198 138.066,91.76 139.277,101.352
KEY_READ1: C_KEY1.1 KEY1.1 KEY1.3 R_KEYT1.1 UMCC1.37 | length 26.5
  Top Layer w0.3: UMCC1.37@131.521,76.078 132.38,75.22 cw(c131.703,74.543) 132.66,74.543 132.66,64.038 ccw(c133.304,64.038) 133.304,63.394 KEY1.3@134.822,63.394 ; KEY1.1@140.029,63.394 C_KEY1.1@143.08,63.394 R_KEYT1.1@144.73,63.394
  Top Layer w1: KEY1.3@134.822,63.394 v1(134.822,64.488) ; v1(138.62,64.49) 139.716,63.394 KEY1.1@140.029,63.394
  Bottom Layer w1: v1(134.822,64.488) 138.618,64.488 v1(138.62,64.49)
KEY_READ2: C_KEY2.1 KEY2.1 KEY2.3 R_KEYT2.1 UMCC1.38 | length 30
  Top Layer w0.3: UMCC1.38@131.874,76.432 136.096,72.211 cw(c135.385,71.5) 136.39,71.5 136.39,69.83 136.23,69.67 ; KEY2.3@132.161,60.207 132.161,61.451 cw(c132.699,61.451) 132.699,61.989 135.699,61.989 ccw(c135.699,62.65) 136.36,62.65 136.36,67.82 136.36,68.52 ; R_KEYT2.1@135.732,70.42 135.732,69.69 ; C_KEY2.1@135.998,68.694 C_KEY2.1@135.732,68.96 135.732,69.69 ; C_KEY2.1@136,68.641 cw(c136,68.281) 136.36,68.281 ; 136.36,68.28 cw(c136.72,68.28) 136.72,68.64 ; 136.4,69.15 136.4,69.69 135.732,69.69
  Top Layer w0.6: KEY2.1@132.161,55 KEY2.3@132.161,60.207
KEY_READ3: C_KEY3.1 KEY3.1 KEY3.3 R_KEYT3.1 UMCC1.39 | length 31.8
  Top Layer w0.3: UMCC1.39@132.228,76.786 137.436,71.578 cw(c137.016,71.158) 137.61,71.158 137.61,71.05 ; 137.61,68.32 cw(c137.97,68.32) 137.97,68.68 ; 137.96,70.7 cw(c137.96,71.05) 137.61,71.05 ; C_KEY3.1@138.456,68.96 C_KEY3.1@138.456,69.334 ; R_KEYT3.1@138.456,70.046 cw(c138.1,70.046) 138.1,69.69 ; R_KEYT3.1@138.456,70.42 138.456,69.69 ; KEY3.3@138.842,60.778 cw(c138.629,60.566) KEY3.3@138.929,60.566 ; KEY3.3@138.929,60.207 137.433,60.207 cw(c137.433,60.73) 136.91,60.73 136.91,66.934 cw(c137.72,66.934) 137.147,67.507 137.385,67.745 ccw(c136.841,68.289) 137.61,68.289 137.61,69.2 ; 137.61,69.2 cw(c138.1,69.2) 138.1,69.69 ; 137.61,69.2 137.61,70.18 ; 137.61,70.18 ccw(c138.1,70.18) 138.1,69.69 ; 137.61,70.18 137.61,71.05 ; 138.1,69.69 cw(c138.1,69.334) C_KEY3.1@138.456,69.334 ; 138.1,69.69 138.456,69.69 ; C_KEY3.1@138.456,69.334 138.456,69.69
  Top Layer w0.6: KEY3.1@138.929,55 KEY3.3@138.929,60.207
key_volume: R_PL5.2 S1.1 UMCC1.25 | length 14.2
  Top Layer w0.3: v1@119.788,73.8 121.183,73.8 ccw(c121.183,74.753) 121.856,74.079 UMCC1.25@124.917,77.139
  Bottom Layer w0.3: R_PL5.2@116.52,69.71 S1.1@120.14,69.71 v1(120.14,73.8)
LED_OUT1: RPSn1.2 UMCC1.51 | length 45.3
  Top Layer w0.3: UMCC1.51@134.703,83.39 136.401,85.088 cw(c136.912,84.578) 136.912,85.3 141.326,85.3 cw(c141.326,84.301) 142.033,85.007 144.785,82.255 cw(c144.574,82.042) 144.786,82.254 v1(144.81,82.23) ; v1(166.316,89.55) RPSn1.2@166.316,90.88
  Bottom Layer w0.3: v1(144.81,82.23) 144.81,80.86 ccw(c145.8,80.86) 145.8,79.87 159.06,79.87 ccw(c159.06,81.07) 160.26,81.07 160.26,88.683 cw(c161.127,88.683) 161.127,89.55 v1@165.916,89.55
LED_OUT2: RPSn2.2 UMCC1.52 | length 45.7
  Top Layer w0.3: UMCC1.52@134.349,83.744 136.682,86.076 cw(c137.56,85.199) 137.56,86.44 v1(141.52,86.44) ; v1(166.316,86.22) RPSn2.2@166.316,87.55
  Bottom Layer w0.3: v1(141.52,86.44) 141.52,80.411 ccw(c142.598,80.408) 142.599,79.33 161.45,79.33 ccw(c161.45,80.39) 162.51,80.39 162.51,83.05 cw(c163.258,83.05) 162.729,83.579 165.199,86.049 cw(c165.611,85.637) 165.611,86.22 v1(166.316,86.22)
MCU_+3.3: "Ferrit  1.1" CLP1.1 CLP2.1 CLP3.1 CLP4.1 CLP5.1 UMCC1.1 UMCC1.13 UMCC1.19 UMCC1.32 UMCC1.48 UMCC1.64 | length 99.7
  Top Layer w0.3: CLP5.1@118.3,78.55 119.291,77.559 ccw(c119.579,77.848) 119.579,77.44 120.668,77.44 ccw(c120.668,78.181) 121.192,77.657 UMCC1.19@122.795,79.26 123.42,79.885 cw(c123.77,79.534) 123.77,80.03 cw(c123.77,79.571) 124.094,79.896 128.199,75.791 ; CLP4.1@120.21,84.47 120.278,84.238 120.285,84.214 120.298,84.17 120.403,84.274 cw(c120.249,84.078) 120.425,84.256 120.678,84.002 ; 120.679,84.002 ccw(c120.89,84.214) 121.102,84.002 121.635,84.535 cw(c121.996,84.174) 121.996,84.685 cw(c121.996,84.174) 122.355,84.537 cw(c121.996,84.174) 122.357,84.535 122.678,84.214 UMCC1.13@123.031,83.861 ; UMCC1.13@122.913,83.979 UMCC1.13@123.031,83.861 ; UMCC1.13@123.149,83.744 UMCC1.13@123.031,83.861 ; v1(126.81,90.3) 126.81,91.11 cw(c127.31,91.11) 127.31,91.61 CLP1.1@128.048,91.61 128.048,90.235 ccw(c128.502,90.233) 128.183,89.91 128.316,89.777 ; UMCC1.32@126.871,74.142 UMCC1.32@127.391,74.664 ; UMCC1.32@127.06,74.332 cw(c127.385,74.007) 127.385,74.466 cw(c127.385,73.971) 127.724,74.332 ; UMCC1.32@127.391,74.664 129.921,77.194 ccw(c129.296,77.819) 130.18,77.819 v1(130.18,78.529) 126.675,82.034 ccw(c126.153,81.512) 126.153,82.25 124.841,82.25 cw(c124.841,82.73) 124.502,82.391 UMCC1.13@123.031,83.861 ; UMCC1.1@127.391,87.986 127.853,88.448 ; UMCC1.32@127.82,75.094 ccw(c127.282,75.632) 127.82,76.17 ccw(c128.358,76.708) 128.896,76.17 ; 127.854,88.449 128.315,88.91 ; 129.185,88.908 UMCC1.64@130.107,87.986 ; 129.184,88.909 129.183,88.91 ; CLP2.1@129.292,71.46 129.292,72.59 ccw(c128.873,72.59) 129.169,72.886 127.724,74.332 ; UMCC1.48@135.25,80.18 135.622,80.18 ; UMCC1.48@135.622,79.808 135.622,80.18 ; 138.624,82.788 138.23,82.788 ; 140.315,81.097 ccw(c140.526,81.31) 140.526,81.01 141.803,81.01 ; 140.314,81.098 139.994,81.418 139.896,81.516 CLP3.1@139.799,81.613 139.741,81.671 v1(137.842,83.57) 138.23,83.182 138.23,82.788 ; 141.805,81.01 141.806,81.01 ccw(c141.805,81.651) 142.258,81.198 142.35,81.29 ; UMCC1.32@127.391,74.664 127.724,74.996 ccw(c128.049,74.671) 127.59,74.671 ccw(c128.085,74.671) 127.734,74.322 ; UMCC1.32@127.391,74.664 127.724,74.332 ; 127.724,74.332 cw(c127.385,73.971) 127.734,74.322 ; 127.734,74.322 cw(c127.385,73.971) 127.735,74.321 cw(c128.085,74.671) 127.734,74.322 ; 128.316,88.911 ccw(c127.88,89.344) 128.316,89.777 ; 128.316,88.911 cw(c128.749,88.475) 129.183,88.91 ; 128.316,89.777 128.575,89.518 cw(c128.364,89.304) 128.577,89.516 129.182,88.911 cw(c128.97,88.698) 129.183,88.91 ; 135.622,80.18 138.23,82.788
  Top Layer w0.6: CLP3.1@139.896,81.516 142.14,81.516 ; 140.526,81.31 142.77,81.31
  Bottom Layer w0.3: v1(126.81,90.3) 129.416,92.906 cw(c130.44,91.881) 130.44,93.33 135.81,93.33 cw(c135.81,92.35) 136.79,92.35 136.79,87.733 ccw(c138.053,87.733) 137.159,86.841 ccw(c138.053,87.733) 137.16,86.84 137.501,86.499 cw(c136.678,85.676) 137.842,85.677 ; v1(130.18,78.529) 136.839,78.529 ccw(c136.839,79.532) 137.842,79.532 v1(137.842,83.57) 137.842,85.08 137.842,85.676
MCU_GND: "Ferrit  2.1" C_LOm.2 CLP1.2 CLP2.2 CLP3.2 CLP4.2 CLP5.2 UMCC1.12 UMCC1.18 UMCC1.31 UMCC1.47 UMCC1.63 | length 86.7
  Top Layer w0.3: 116.858,81.452 cw(c117.362,81.955) 116.65,81.955 cw(c117.362,81.955) 116.858,82.458 ; 116.859,81.451 117.672,80.638 cw(c117.194,80.16) 117.87,80.16 ; 116.859,82.459 120.089,85.689 cw(c120.43,85.347) 120.43,85.83 cw(c120.43,85.395) 120.737,85.703 CLP4.2@121.09,85.35 121.458,85.718 cw(c121.67,85.505) 121.882,85.718 UMCC1.12@123.502,84.097 ; CLP5.2@117.42,79.43 CLP5.2@117.672,79.682 ; CLP5.2@117.561,79.791 ccw(c117.082,80.268) 117.758,80.268 ; 117.56,80.746 cw(c117.082,80.268) 117.758,80.268 ; 117.59,80.72 118.15,80.16 ; CLP5.2@117.674,79.684 cw(c118.151,79.205) 118.151,79.881 ; 117.758,80.548 117.758,80.268 ; CLP5.2@117.781,79.571 cw(c118.259,79.092) 118.259,79.768 ; 118.431,79.881 118.151,79.881 ; 118.539,79.768 118.259,79.768 ; 118.622,79.688 ccw(c119.1,80.166) 119.1,79.49 ccw(c119.1,80.166) 119.577,79.687 ; 118.737,79.57 ccw(c118.259,79.092) 118.259,79.768 ; 119.578,79.688 v1@119.83,79.94 ; 119.657,79.607 ccw(c120.136,79.13) 119.46,79.13 ccw(c120.136,79.13) 119.658,78.652 ; 119.658,79.608 v1@119.91,79.86 ; v1(119.98,79.99) 119.19,79.2 119.11,79.2 ; 121.014,78.186 cw(c120.54,78.66) 120.54,77.99 cw(c120.54,78.521) 120.164,78.146 119.11,79.2 ; 121.014,78.186 UMCC1.18@122.442,79.614 ; v1(122.41,70.94) 123.237,70.94 ccw(c123.237,71.383) 123.55,71.07 124.243,71.763 cw(c124.912,71.093) 124.912,72.04 125.75,72.04 ; UMCC1.12@123.502,84.097 124.186,83.414 ccw(c124.46,83.688) 124.46,83.3 ccw(c124.46,83.686) 124.733,83.413 127.402,86.082 cw(c127.98,85.503) 127.98,86.321 128.598,86.321 ; UMCC1.31@127.038,75.018 126.31,74.29 ccw(c126.719,73.88) 126.14,73.88 126.14,72.43 ; CLP2.2@128.048,71.46 127.629,71.879 ccw(c127.24,71.49) 127.628,71.88 ccw(c127.24,71.49) 127.24,72.04 126.53,72.04 ; CLP1.2@129.292,91.61 130.93,91.61 cw(c130.93,91.14) 131.4,91.14 131.4,88.906 cw(c130.594,88.906) 131.164,88.336 UMCC1.63@130.46,87.633 129.539,86.711 cw(c128.598,87.652) 128.598,86.321 ; 129.677,85.801 cw(c130.201,86.324) 129.679,86.849 ; 130.61,83.18 cw(c131.189,83.759) 130.37,83.759 130.37,84.778 ccw(c129.593,84.778) 130.142,85.328 129.539,85.931 ccw(c128.598,84.99) 128.598,86.321 ; 130.61,83.18 131.142,82.648 ccw(c131.91,83.416) 131.91,82.33 cw(c131.91,81.291) 132.645,82.026 UMCC1.47@135.056,79.614 136.119,78.551 136.37,78.301 ccw(c136.975,78.906) 136.975,78.05 138.935,78.05 ccw(c138.935,78.473) 139.234,78.174 ; 117.87,80.16 cw(c117.194,80.16) 117.673,79.683 cw(c118.15,79.204) 118.15,79.88 ; 117.87,80.16 117.87,80.44 118.43,79.88 ; 118.151,79.881 cw(c118.151,79.205) 118.629,79.683 ; 118.15,79.88 cw(c118.15,79.204) 118.628,79.682 ; 118.15,79.88 118.43,79.88 ; 118.43,79.88 118.628,79.682 ; 118.628,79.682 119.11,79.2 ; 125.75,72.04 ccw(c125.75,72.43) 126.14,72.43 ; 125.75,72.04 126.53,72.04 ; 126.14,72.43 ccw(c126.53,72.43) 126.53,72.04
  Top Layer w0.6: C_LOm.2@115.414,78.016 116.006,78.016 CLP5.2@117.42,79.43 ; CLP3.2@138.919,80.733 139.65,80.002 139.65,78.59 139.234,78.174
  Bottom Layer w0.3: v1(119.98,79.99) 122.185,77.719 cw(c121.639,77.175) 122.41,77.175 v1(122.41,70.94)
MCU_Reset: "mcu reset.1" "mcu reset.3" CXT_Reset1.1 PROGRAM.1 R_Reset1.1 UMCC1.7 | length 59.6
  Top Layer w0.3: CXT_Reset1.1@96.607,93 R_Reset1.1@98.16,93 98.16,91.883 ccw(c98.802,91.882) 98.798,91.24 ccw(c98.802,91.882) 98.801,91.24 104.84,91.24 cw(c104.84,90.62) 105.46,90.62 105.46,86.83 ; 103.367,86.317 104.947,86.317 ; UMCC1.7@125.27,85.865 122.676,88.459 ccw(c120.852,86.663) 119.034,88.464 110.778,80.208 cw(c110.051,80.822) 110.051,79.87 106.239,79.87 cw(c106.239,80.649) 105.46,80.651 105.46,85.805 ; 104.947,86.317 cw(c104.947,85.805) 105.46,85.805 ; 104.947,86.317 ccw(c104.947,86.83) 105.46,86.83 ; 105.46,85.805 105.46,86.83
  Top Layer w1: PROGRAM.1@93.82,88.635 95.845,86.61 ccw(c96.552,87.317) 96.552,86.317 98.16,86.317 103.367,86.317
NetAD620BR_1: "AD GAIN.1" "AD GAIN.2" AD620BR.1 R_OPEN.2 | length 18.4
  Top Layer w0.6: R_OPEN.2@63.79,92.63 65.294,92.63 ccw(c65.294,93.078) 65.611,92.761 66.185,93.335 ccw(c65.69,93.83) 66.39,93.83 ; 64.86,102.2 67.4,102.2 67.4,101.099 cw(c66.364,101.099) 67.097,100.367 66.793,100.063 ccw(c67.766,99.09) 66.39,99.09 66.39,94.88 ; AD620BR.1@69.25,94.355 AD620BR.1@68.414,94.355 66.915,94.355 ; 66.39,93.83 cw(c66.915,93.83) 66.915,94.355 ; 66.39,93.83 66.39,94.88 ; 66.39,94.88 ccw(c66.915,94.88) 66.915,94.355
NetAD620BR_2: AD620BR.2 R_DIFF2.2 | length 5.3
  Top Layer w0.4: AD620BR.2@68.414,95.625 69.58,95.625 cw(c69.58,95.275) 69.93,95.275 69.93,93.17 cw(c69.49,93.17) 69.49,92.73 R_DIFF2.2@68.734,92.73
NetAD620BR_3: AD620BR.3 R_DIFF1.2 | length 8.8
  Top Layer w0.4: AD620BR.3@68.414,96.895 69.825,96.895 cw(c69.825,96.16) 70.56,96.16 70.56,92.27 cw(c69.69,92.27) 69.69,91.4 R_DIFF1.2@68.734,91.4
NetAD620BR_5: AD620BR.5 lm358.6 lm358.7 | length 32.7
  Top Layer w0.4: v1(60.85,95.9) 60.85,83.3 ccw(c61.84,83.3) 61.84,82.31 65.6,82.31 ccw(c65.6,83.14) 66.43,83.14 66.43,84.76 cw(c66.93,84.76) 66.93,85.26 68.085,85.26 ccw(c68.085,85.935) 68.76,85.935 lm358.7@68.76,88.1
  Top Layer w0.6: v1@61.25,98.165 AD620BR.5@63.486,98.165 AD620BR.5@64.37,98.165 ; lm358.7@68.76,88.1 lm358.6@70.03,88.1
  Bottom Layer w0.6: v1(60.85,95.9) v1(60.85,98.165)
NetAD620BR_6: AD620BR.6 RP3.2 | length 27.3
  Top Layer w0.4: AD620BR.6@63.486,96.895 60.635,96.895 ccw(c60.635,96.07) 59.81,96.07 59.81,82.68 ccw(c60.8,82.68) 60.8,81.69 65.75,81.69 cw(c65.75,80.869) 66.33,81.45 66.588,81.192 ; 66.588,81.192 ccw(c67.209,81.813) 67.209,80.935 RP3.2@68.786,80.935
NetAD620BR_8: "AD GAIN.3" AD620BR.8 R_OPEN.1 | length 16
  Top Layer w0.6: 62.32,102.2 62.32,100.5 ccw(c63.04,100.5) 63.04,99.78 64.77,99.78 cw(c64.77,99.1) 65.45,99.1 65.45,95.07 cw(c64.735,95.07) 64.735,94.355 AD620BR.8@63.486,94.355 63.38,94.355 62.546,94.355 R_OPEN.1@62.546,92.63 ; 62.55,93.52 cw(c63.38,93.52) AD620BR.8@63.38,94.35
"NetAD OFFSET_1": "AD OFFSET.1" RP1.1 | length 3.4
  Top Layer w0.6: RP1.1@77.93,98.763 77.93,102.2
"NetAD OFFSET_2": "AD OFFSET.2" lm358.5 | length 31.7
  Top Layer w0.6: lm358.5@71.3,88.1 71.3,90.78 71.3,95.39 cw(c72.31,95.39) 72.31,96.4 79.402,96.4 ccw(c79.402,97.868) 80.87,97.868 80.87,103.3 ccw(c79.816,103.3) 79.816,104.354 76.014,104.354 ccw(c76.014,103.73) 75.39,103.73 75.39,102.2
"NetAD OFFSET_3": "AD OFFSET.3" RP2.1 | length 4.8
  Top Layer w0.6: 72.85,102.2 72.85,99.38 ccw(c73.467,99.38) 73.467,98.763 RP2.1@74.479,98.763
"NetADS1115 conector_3": "ADS1115 conector.3" JUMPER2.2 RTW6.2 | length 9.4
  Top Layer w0.6: 63.179,70.624 RTW6.2@67.86,70.624
  Bottom Layer w0.6: 63.155,70.6 63.179,70.624 JUMPER2.2@67.86,70.624
"NetADS1115 conector_5": "ADS1115 conector.5" JUMPER1.2 RTW3.2 | length 9.4
  Top Layer w0.5: 63.179,75.704 67.86,75.704 RTW3.2@67.86,75.711
  Bottom Layer w0.5: 63.179,75.704 JUMPER1.2@67.86,75.704
NetC_BACK1_1: "U_FET DRIVER1.8" C_BACK1.1 DPN1.2 | length 25.4
  Top Layer w0.6: DPN1.2@134.11,96.87 134.903,97.323 135.391,97.811 cw(c136.33,96.872) 136.33,98.2 142.658,98.2 ; 143.534,96.87 143.534,97.324 ; C_BACK1.1@155.25,99.65 153.8,98.2 144.41,98.2 ; 142.658,98.2 cw(c142.658,97.324) 143.534,97.324 ; 142.658,98.2 144.41,98.2 ; 143.534,97.324 cw(c144.41,97.324) 144.41,98.2
NetC_BACK2_1: "U_FET DRIVER2.8" C_BACK2.1 DPN2.2 | length 11.7
  Top Layer w0.6: 109.51,96.87 110.414,96.87 113.22,96.87 114.42,95.67 v1(116.42,95.67)
  Bottom Layer w0.6: v1(116.42,95.67) 118.41,95.67 cw(c118.41,94.95) 119.13,94.95 C_BACK2.1@119.13,93.75
NetC_ICL1_1: C_ICL1.1 ICL7660.4 | length 6.3
  Top Layer w0.6: C_ICL1.1@72.58,89.891 72.58,87.96 ccw(c73.215,87.96) 73.215,87.325 ICL7660.4@75.716,87.325 ICL7660.4@76.6,87.325
NetC_ICL1_2: C_ICL1.2 ICL7660.2 | length 4.5
  Top Layer w0.6: C_ICL1.2@72.58,91.135 72.851,91.135 cw(c72.851,90.111) 73.575,90.835 74.205,90.205 ccw(c75.026,91.026) 75.026,89.865 ICL7660.2@75.716,89.865 ICL7660.2@76.64,89.865
NetC_LK1_2: C_LK1.2 CLM2.1 XX_ADS1115.8 | length 7.3
  Top Layer w0.3: CLM2.1@75.394,69.054 75.905,69.565 ccw(c75.424,70.046) 76.104,70.046 XX_ADS1115.8@76.104,71.611 76.104,72.516 cw(c76.627,72.516) 76.627,73.039 C_LK1.2@79.344,73.039